# Altium PCB 300yuan.PcbDoc
Units mil, origin at the board's own origin, x right, y up, seen from the top; angles counter-clockwise.
Board outline 3134.96 x 3151.95 mil, 2 copper layers (Top Layer, Bottom Layer); 35 components, 23 nets, 152 pads, 18 vias.
Unrouted connection lines stored in the file: 4.
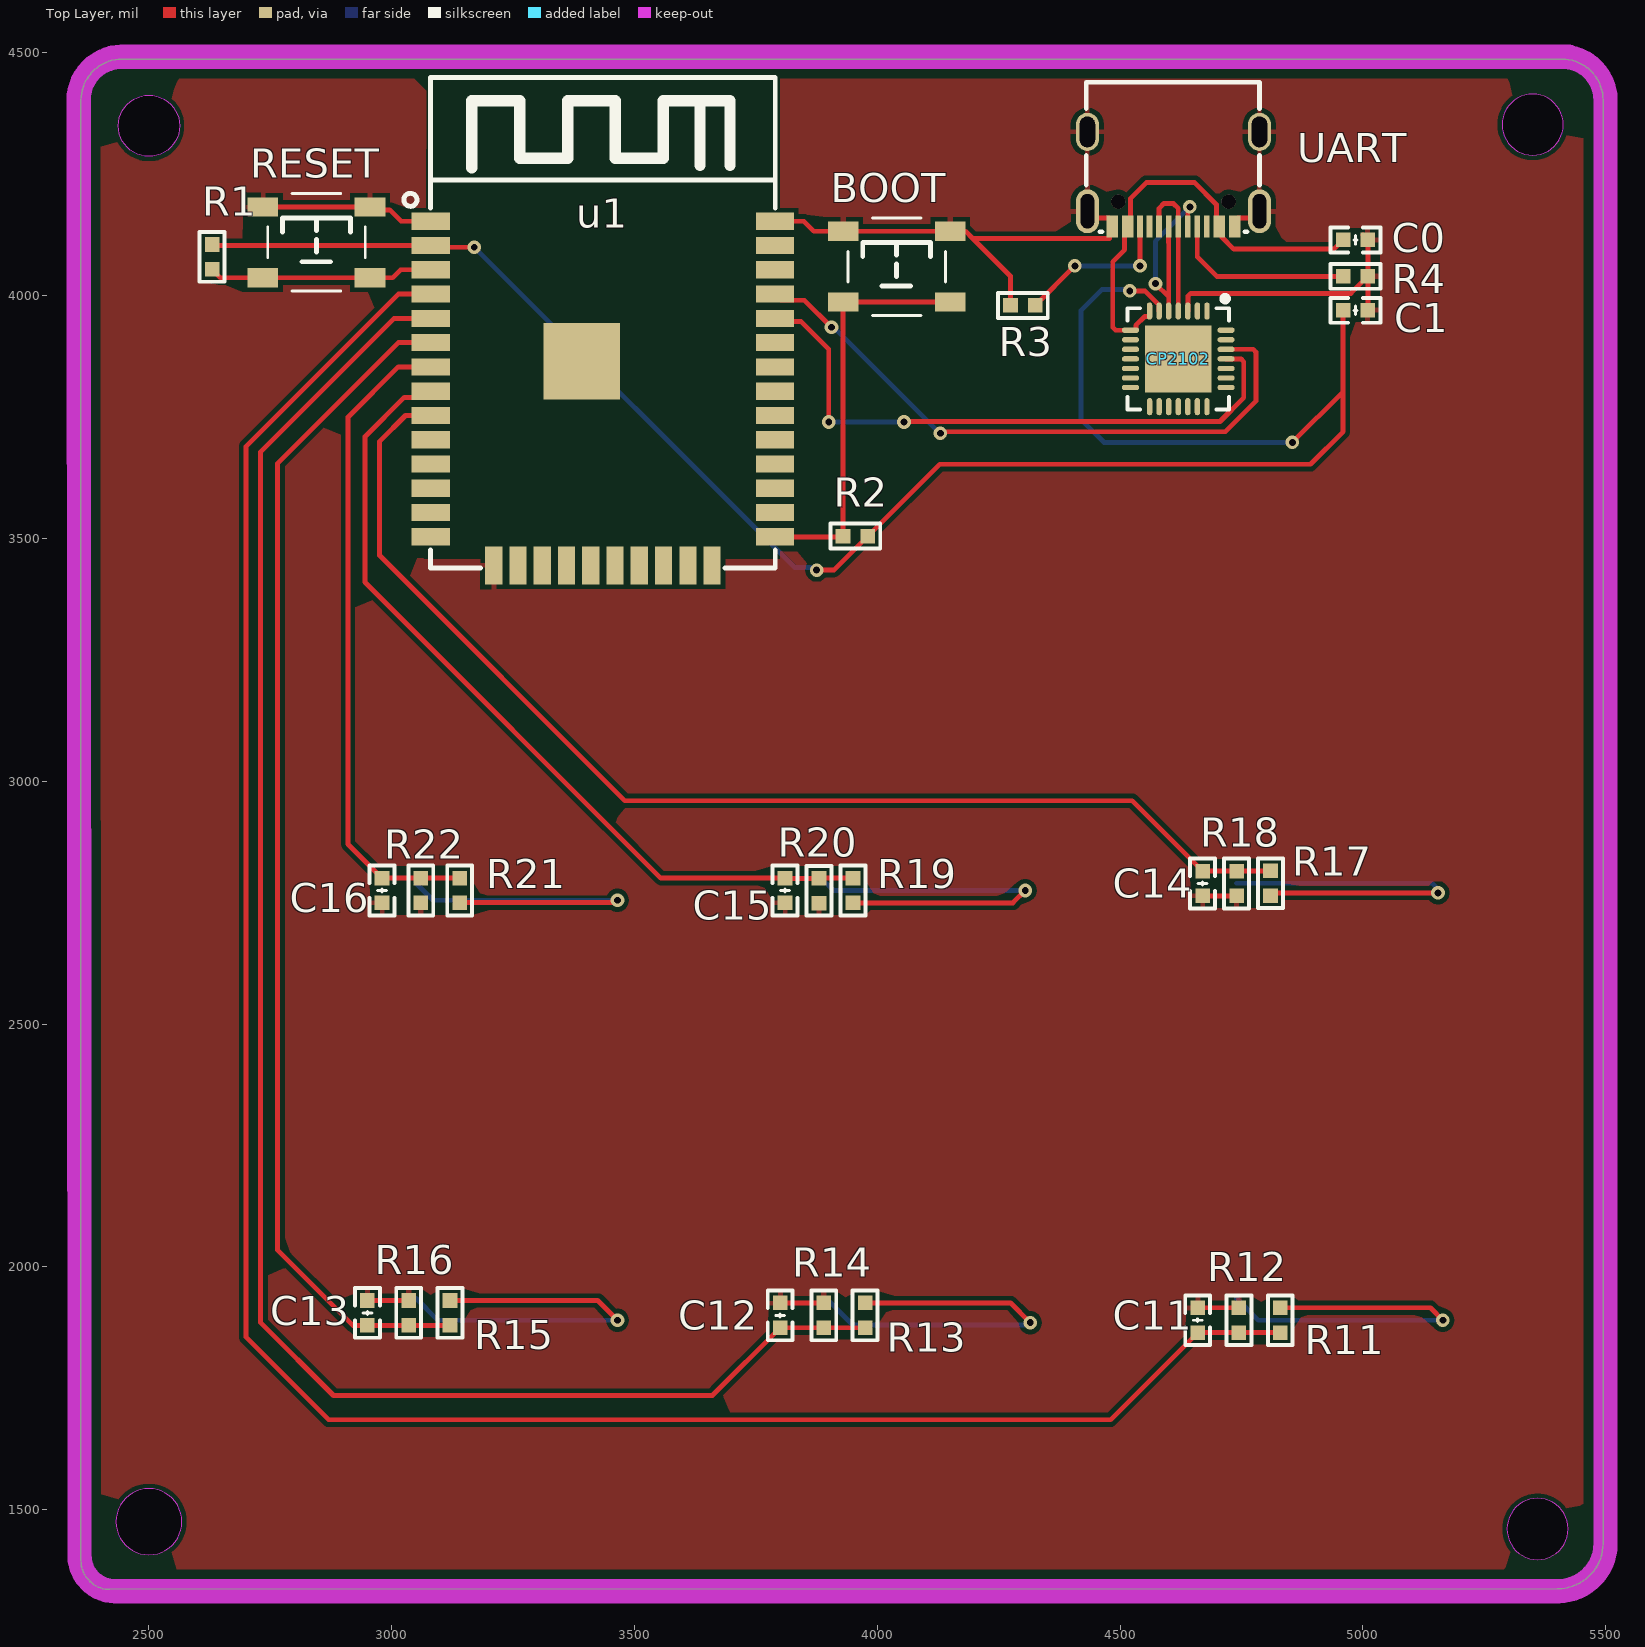
[diagram p0: Top Layer view]
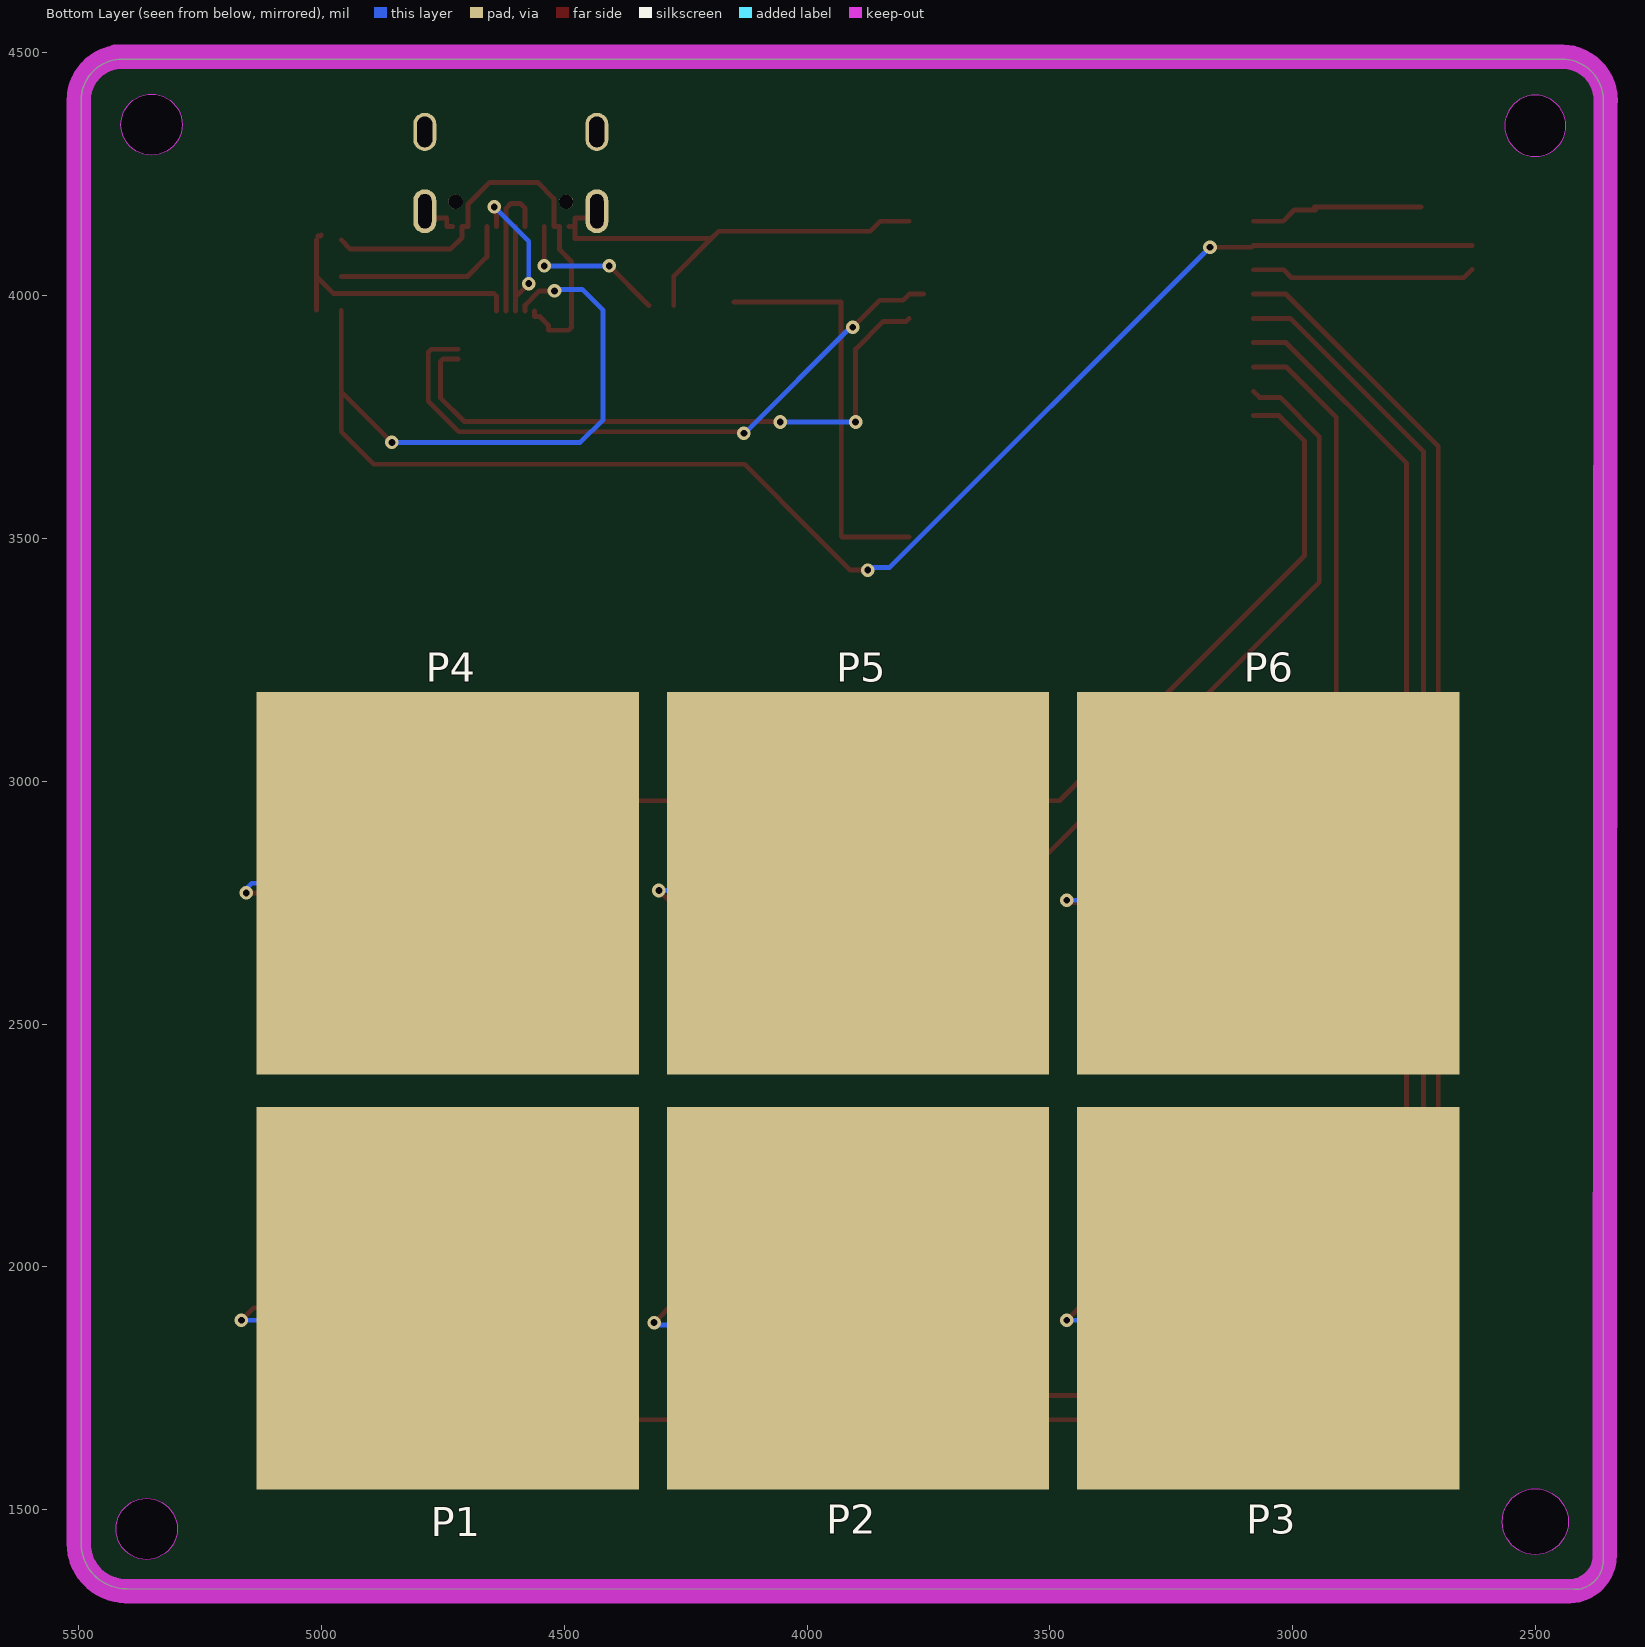
[diagram p1: Bottom Layer view, seen from below]
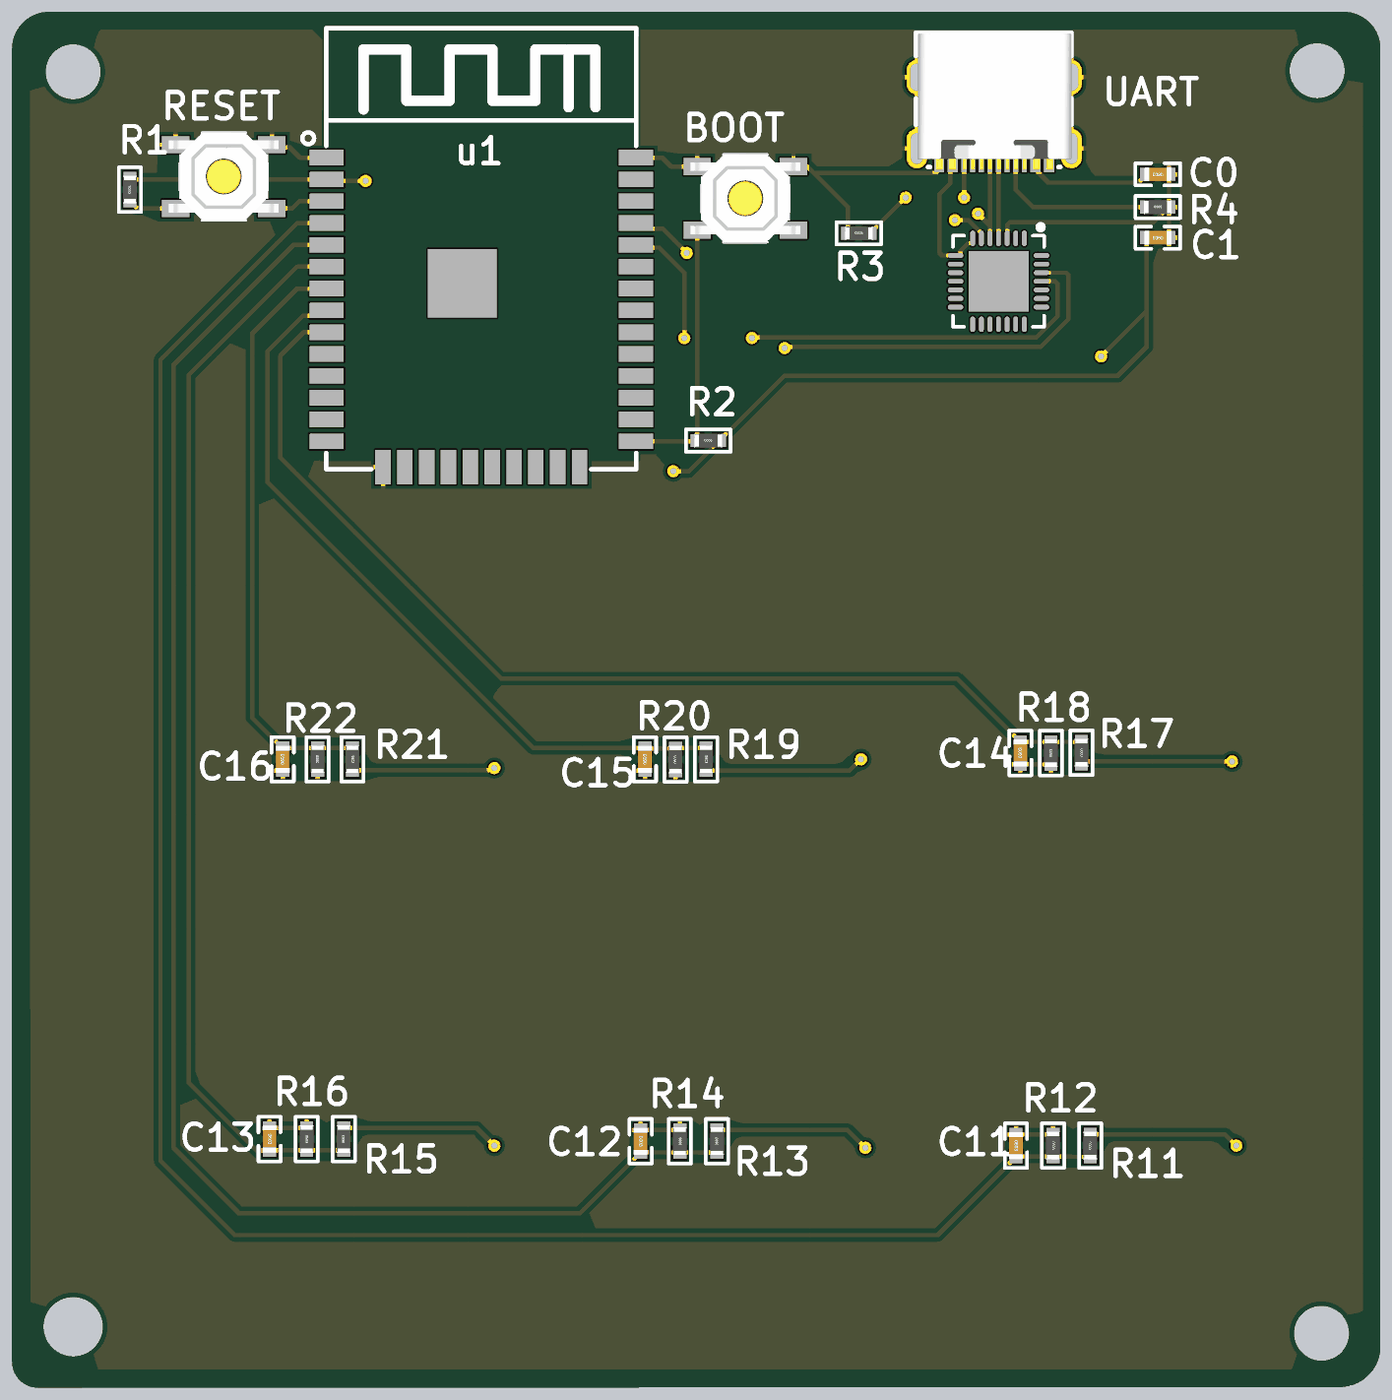
[diagram p2: 3D render of the assembled board from above, using the file's embedded part models]

## Layer stack, top to bottom
Top Solder: solder mask 0.4, Solder Resist, Dk 3.5
Top Layer: signal copper 1.4
Dielectric 1: dielectric 12.6, FR-4, Dk 4.8
Bottom Layer: signal copper 1.4
Bottom Solder: solder mask 0.4, Solder Resist, Dk 3.5

## Board outline
2360,1395 ccw(c2419.59,1395) 2419.59,1335.41 5401.69,1336.73 5401.94,1336.98 ccw(c5401.94,1430) 5494.96,1430 5494.96,4402.72 ccw(c5410.31,4402.72) 5410.31,4487.36 2444.72,4487.36 2444.64,4487.29 ccw(c2444.64,4402.65) 2360,4402.65
cut-out: 2500,4287.01 cw(c2500,4350) 2437.01,4350 cw(c2500,4350) 2500,4412.99 cw(c2500,4350) 2562.99,4350 cw(c2500,4350)
cut-out: 2431.99,1475 ccw(c2500,1475) 2500,1406.99 ccw(c2500,1475) 2568.01,1475 ccw(c2500,1475) 2500,1543.01 ccw(c2500,1475)
cut-out: 5287.01,4352.38 ccw(c5350,4352.38) 5350,4289.38 ccw(c5350,4352.38) 5413,4352.38 ccw(c5350,4352.38) 5350,4415.37 ccw(c5350,4352.38)
cut-out: 5297.01,1460 ccw(c5360,1460) 5360,1397.01 ccw(c5360,1460) 5422.99,1460 ccw(c5360,1460) 5360,1522.99 ccw(c5360,1460)

## Design rules (kind name [scope] priority, off if disabled: settings)
Clearance Clearance_1 [InPolygon vs OnLayer('Keep-Out Layer')] p1: gap=20 ignorepadtopadclearanceinfootprint=FALSE
Clearance [All] p2: gap=10 ignorepadtopadclearanceinfootprint=FALSE except(0: Arc-Hole Track-Hole SMDPad-Hole THPad-Hole Via-Hole Fill-Hole Poly-Hole Region-Hole Text-Hole; 1: Arc-SMDPad Track-SMDPad SMDPad-SMDPad; 5: Arc-Arc Arc-Track Arc-THPad Arc-Via Track-Track Track-THPad Track-Via SMDPad-THPad SMDPad-Via THPad-THPad THPad-Via Via-Via)
MinimumSolderMaskSliver [All] p1: minsoldermaskwidth=0
PolygonConnect [All] p1: connectstyle=Relief reliefconductorwidth=10 reliefentries=4 polygonreliefangle="90 Angle" airgapwidth=10
RoutingVias [All] p1: holewidth=14 width=28 viastyle="Through Hole" minholewidth=14 minwidth=28 maxholewidth=14 maxwidth=28
SilkToSolderMaskClearance [IsPad] p1: minsilkscreentomaskgap=0 clearancetoexposedcopper=TRUE
SolderMaskExpansion [All] p1: expansion=4 istentingtop=FALSE
Width [All] p1: maxlimit=10 minlimit=10 preferedwidth=10
28 further rules are at their usual default settings.

## Components (designator, comment, footprint, x,y, rotation, side; value= is the part's Value field where it differs from the comment)
BOOT "4x4x1.5" "SW SMD-4*4*1.5" 4040,4060 r0 top
C0 "1uF" C0603_L 4985,4115 r180 top
C1 "1uF" C0603_L 4985,3970 r180 top
C11 "0.1uF" C0603_L 4660,1890 r270 top
C12 "0.1uF" C0603_L 3800,1900 r270 top
C13 "0.1uF" C0603_L 2950,1905 r270 top
C14 "0.1uF" C0603_L 4670,2789.41 r90 top
C15 "0.1uF" C0603_L 3810,2775 r90 top
C16 "0.1uF" C0603_L 2980,2775 r90 top
CP2102 "" PCBComponent_1 4620,3870 r180 top
P1 "2*2" 2*2 4740,1930 r180 bottom (schematic designator p1)
P2 "2*2" 2*2 3895,1930 r180 bottom (schematic designator p2)
P3 "2*2" 2*2 3050,1930 r180 bottom (schematic designator p3)
P4 "2*2" 2*2 4740,2785 r180 bottom (schematic designator p4)
P5 "2*2" 2*2 3895,2785 r180 bottom (schematic designator p5)
P6 "2*2" 2*2 3050,2785 r180 bottom (schematic designator p6)
R1 "12K" R0603_L 2630,4080 r90 top
R2 "12K" R0603_L 3955,3505 r0 top
R3 "5.1K" R0603_L 4300,3980 r0 top
R4 "5.1K" R0603_L 4985,4040 r0 top
R11 "1K" R0603_L 4830,1890 r90 top
R12 "1K" R0603_L 4745,1890 r270 top
R13 "1K" R0603_L 3975,1900 r90 top
R14 "1K" R0603_L 3890,1900 r270 top
R15 "1K" R0603_L 3120,1905 r90 top
R16 "1K" R0603_L 3035,1905 r270 top
R17 "1K" R0603_L 4810,2790 r270 top
R18 "1K" R0603_L 4740,2789.41 r90 top
R19 "1K" R0603_L 3950,2775 r270 top
R20 "1K" R0603_L 3880,2774.41 r90 top
R21 "1K" R0603_L 3140,2775 r270 top
R22 "1K" R0603_L 3060,2775 r90 top
RESET "4x4x1.5" "SW SMD-4*4*1.5" 2845,4110 r0 top
u1 "esp32" esp32 3400,4005 r0 top
UART "TYPE-C 2.0 -16P" USB-C-SMD_16P 4610,4240 r0 top (schematic designator USBC?)

## Footprints (in the part's own frame and the unit in brackets; to place one, negate y for a bottom-side part, rotate by r counter-clockwise, add the part's x,y. Pads: shape width x height; smd on the part's side, far side on the other; paste and mask are expansions set on the pad)
2*2 [mm]
  rect 20x20 smd: 1(0,0.127)
C0603_L [mil] "无极性贴片电容"
  rect 30x30 smd: 1(-25.59,0) 2(25.59,0)
  silkscreen extent -51,-26 51,26, body extent -31,-16 32,16, height 33
esp32 [mm]
  rect 2x0.9 smd: 1(-8.113,3.77) 2(-8.113,2.5) 3(-8.113,1.23) 4(-8.113,-0.04) 5(-8.113,-1.31) 6(-8.113,-2.58) 7(-8.113,-3.85) 8(-8.113,-5.12) 9(-8.113,-6.39) 10(-8.113,-7.66) 11(-8.113,-8.93) 12(-8.113,-10.2) 13(-8.113,-11.47) 14(-8.113,-12.74) 25(9.887,-12.74) 26(9.887,-11.47) 27(9.887,-10.2) 28(9.887,-8.93) 29(9.887,-7.66) 30(9.887,-6.39) 31(9.887,-5.12) 32(9.887,-3.85) 33(9.887,-2.58) 34(9.887,-1.31) 35(9.887,-0.04) 36(9.887,1.23) 37(9.887,2.5) 38(9.887,3.77)
  rect 0.9x2 smd: 15(-4.828,-14.24) 16(-3.558,-14.24) 17(-2.288,-14.24) 18(-1.018,-14.24) 19(0.252,-14.24) 20(1.522,-14.24) 21(2.792,-14.24) 22(4.062,-14.24) 23(5.332,-14.24) 24(6.602,-14.24)
  rect 4x4 smd: 39(-0.213,-3.546)
  silkscreen extent -9.52,-14.37 9.91,11.3
PCBComponent_1 [mm]
  oval 0.28x0.9 smd: 1(-1.501,-2.5) 2(-1.001,-2.5) 3(-0.5,-2.5) 4(0,-2.5) 5(0.5,-2.5) 6(1.001,-2.5) 7(1.501,-2.5) 15(1.501,2.5) 16(1.001,2.5) 17(0.5,2.5) 18(0,2.5) 19(-0.5,2.5) 20(-1.001,2.5) 21(-1.501,2.5)
  oval 0.9x0.28 smd: 8(2.5,-1.501) 9(2.5,-1.001) 10(2.5,-0.5) 11(2.5,0) 12(2.5,0.5) 13(2.5,1.001) 14(2.5,1.501) 22(-2.5,1.501) 23(-2.5,1.001) 24(-2.5,0.5) 25(-2.5,0) 26(-2.5,-0.5) 27(-2.5,-1.001) 28(-2.5,-1.501)
  rect 3.5x3.5 smd: 29(0,0)
  silkscreen extent -2.65,-3.3 2.65,2.65
R0603_L [mil] "1/10W贴片电阻"
  rect 30x30 smd: 1(-25.59,0) 2(25.59,0)
  silkscreen extent -51,-26 51,26, body extent -31,-16 32,16, height 16
"SW SMD-4*4*1.5" [mm] "轻触开关，长宽高：4*4*1.5mm           淘宝ID:黄晶宝石"
  rect 1.6x1 smd: 1(-2.8,1.85) 2(-2.8,-1.85) 3(2.8,-1.85) 4(2.8,1.85)
  silkscreen extent -2.55,-2.55 2.55,2.55, body extent -3.2,-2.6 3.2,2.6, height 1.5
USB-C-SMD_16P [mm] "封装库来自淘宝ID:黄晶宝石"
  oval 1.2x2.3 hole 0.7 slot 1.8 at 90 deg: 0(-4.5,-1.675) 0(4.5,-1.675)
  oval 1.2x2 hole 0.8 slot 1.6 at 90 deg: 0(-4.5,2.475) 0(4.5,2.475)
  rect 0.3x1.15 smd: A1(3.35,-2.473) A4(2.55,-2.471) A5(1.25,-2.475) A6(0.25,-2.475) A7(-0.25,-2.473) A9(-2.55,-2.475) A12(-3.35,-2.475) B1(-3.05,-2.475) B4(-2.25,-2.475) B5(-1.75,-2.475) B6(-0.75,-2.475) B7(0.75,-2.473) B9(2.25,-2.471) B12(3.05,-2.473)
  rect 0.3x1.148 smd: A8(1.75,-2.475) B8(-1.25,-2.475)
  round 0.75 hole 0.75 unplated: ""(-2.89,-1.175) ""(2.89,-1.175)
  silkscreen extent -4.56,-2.75 4.5,5.08, body extent -4.44,-2.87 4.5,5.03, height 3.25

## Part data
BOOT RESET: library part "SW SMD-4x4", "贴片4x4轻触开关", BOM名称=贴片4x4轻触开关, 封装库来自淘宝卖家ID：黄晶宝石=其他店铺购入均为盗版假冒封装库，请立即申请退款, 联系卖家，免费查找封装=唯一出售店铺网址https://shop463601444.taobao.com
C0 C1 C11 C12 C13 C14 C15 C16: library part C, "贴片电容", BOM名称=无极性贴片电容, 封装库来自淘宝卖家ID： 黄晶宝石=其他店铺购入均为盗版假冒封装库，请立即申请退款，本店现金奖励5-50元, 联系卖家，免费查找封装=唯一出售店铺网址https://shop463601444.taobao.com
CP2102: library part cp2102
R1 R2 R3 R4 R11 R12 R13 R14 R15 R16 R17 R18 R19 R20 R21 R22: library part R, "贴片电阻", BOM名称=贴片电阻, 封装库来自淘宝卖家ID： 黄晶宝石=其他店铺购入均为盗版假冒封装库，请立即申请退款，本店现金奖励5-50元, 联系卖家，免费查找封装=唯一出售店铺网址https://shop463601444.taobao.com
UART: library part USB2.0_Type-C_16Pin, "USB2.0_Type-C_16Pin母座", 联系卖家 免费技术支持=封装库来自淘宝卖家ID：黄晶宝石, 联系卖家 免费查找封装=唯一出售店铺网址https://shop463601444.taobao.com

## Via types
v1: diameter 28, hole 14, Top Layer to Bottom Layer, 18 vias

## Nets (pads, with @x,y where several pads share a name; then routed paths per layer and width w, separated by ;. In a path a pad name is that pad's centre, name@x,y a point inside that pad or via, vN(x,y) a via of type N, cw(c..) or ccw(c..) an arc to the next point about the centre after c; other vN are vias at no path point)
3V3: C1.2 CP2102.6 R1.2 R2.2 u1.2 | length 4005.5
  Top Layer w10: R1.2@2630,4103.43 u1.2 3084.03,4100 v1(3170,4100) ; v1(3875,3435) 3910.59,3435 R2.2 4128.59,3653 4892.41,3653 4959.41,3720 4959.41,3802.41 ; v1(4520,4010) 4551.22,4010 4580.6,3980.62 CP2102.6 ; v1(4855,3698) 4959.41,3802.41 ; C1.2 4959.41,3802.41
  Bottom Layer w10: v1(3170,4100) 3829.57,3440.43 3864.7,3440.43 3870.13,3435 v1(3875,3435) ; v1(4520,4010) 4517,4013 4463,4013 4420,3970 4420,3745 4467,3698 v1(4855,3698)
5V: C0.2 CP2102.7 CP2102.8 UART.A4 UART.A9 UART.B4 UART.B9 | length 947
  Top Layer w10: CP2102.7@4560.7,3968.22 CP2102.7 ; CP2102.7@4561.37,3965 4561.37,3958.2 4560.43,3957.25 4550.85,3957.25 4532.74,3939.14 4532.74,3929.57 4532.27,3929.1 4490.86,3929.1 4485,3934.96 4485,4070 4509.61,4094.61 UART.A9 UART.B4 4521.42,4200 4554.78,4233.36 4653.22,4233.36 4698.58,4188 UART.B9 UART.A4 4710.39,4120 4734.39,4096 4940.41,4096 C0.2
AD0: C11.2 R11.1 R12.2 u1.4 | length 4620.2
  Top Layer w10: u1.4 3013.43,4003.43 2700,3690 2700,1855 2870,1685 4480.58,1685 C11.2 R12.2 4787,1864.41 R11.1
AD3: C12.2 R13.1 R14.2 u1.5 | length 3622.9
  Top Layer w10: u1.5 3004.83,3953.43 2730,3678.6 2730,1885 2880,1735 3660.58,1735 C12.2 R14.2 3932,1874.41 R13.1
AD4: C13.2 R15.1 R16.2 u1.6 | length 2458.4
  Top Layer w10: u1.6 3013.43,3903.43 2765,3655 2765,2034.28 2919.87,1879.41 C13.2 R16.2 3077,1879.41 R15.1
AD5: C14.2 R17.1 R18.2 u1.9 | length 2467.2
  Top Layer w10: u1.9 3028.43,3753.43 2975,3700 2975,3465 3480,2960 4525,2960 C14.2 R18.2 4809.4,2815 R17.1
AD6: C15.2 R19.1 R20.2 u1.8 | length 1731.4
  Top Layer w10: u1.8 3067.88,3790.71 3025.71,3790.71 2945,3710 2945,3410 3554.41,2800.59 C15.2 ; C15.2@3810.59,2800 R20.2 3880.59,2800.59 R19.1
AD7: C16.2 R21.1 R22.2 u1.7 | length 1351.8
  Top Layer w10: u1.7 3013.43,3853.43 2910,3750 2910,2870.59 C16.2 R22.2 R21.1
D+: CP2102.4 UART.A6 UART.B6 | length 296.8
  Top Layer w10: UART.B6 4580.47,4180 4590.47,4190 4609.84,4190 4619.84,4180 UART.A6 4619.84,4140.9 4620,4140.9 CP2102.4
D-: CP2102.5 UART.A7 UART.B7 | length 442.5
  Top Layer w10: v1(4573,4025) 4600.3,3997.7 ; UART.A7 4600.16,4109.87 4600.3,4109.72 4600.3,3997.7 ; CP2102.5 4600.3,3997.7 ; UART.B7 4639.53,4178.53 v1(4644,4183)
  Bottom Layer w10: v1(4573,4025) 4573,4112 v1(4644,4183)
GND: BOOT.1 BOOT.4 C0.1 C1.1 C11.1 C12.1 C13.1 C14.1 C15.1 C16.1 CP2102.3 R3.1 R4.2 R12.1 R14.1 R16.1 R18.1 R20.1 R22.1 RESET.1 RESET.4 u1.1 u1.15 u1.38 UART.0 UART.A1 UART.A12 UART.B1 UART.B12 | length 2317.2
  Top Layer w10: RESET.1 RESET.4 ; C13.1 R16.1 ; RESET.4@2952.23,4176.96 2995.87,4176.96 3019.4,4153.43 u1.1 ; u1.38 3849,4153.43 3869.6,4132.83 BOOT.1 BOOT.4 4182.17,4132.83 4197,4118 ; C12.1 R14.1 ; R3.1 4274.41,4040.59 4197,4118 ; UART.0@4432.83,4174.06 4446.69,4160.2 4477.21,4160.2 4478.11,4159.3 UART.A12 ; UART.B1 UART.A12 ; CP2102.3 4639.7,3999.14 4645.56,4005 4975.59,4005 R4.2 ; C11.1 R12.1 ; C14.1 R18.1 ; UART.B12 UART.A1 4741.89,4159.36 4742.8,4160.26 4773.37,4160.26 UART.0@4787.17,4174.06 ; C0.1@5000.59,4125 5002.5,4123.09 C0.1@5006.91,4123.09 ; C1.1 5010.59,4004 R4.2 ; C0.1 5010.59,4077.01 R4.2 ; 4197,4118 4478.11,4118 UART.A12
NetBOOT_2: BOOT.2 BOOT.3 R2.1 u1.25 | length 843.6
  Top Layer w10: u1.25 3927.84,3503.43 R2.1 3929.41,3745 3929.76,3745.36 BOOT.2 BOOT.3
Netp1_1: P1.1 R11.2 | length 789.2
  Top Layer w10: R11.2 5139.41,1915.59 v1(5165,1890)
  Bottom Layer w10: P1.1 4785,1890 v1(5165,1890)
Netp2_1: P2.1 R13.2 | length 801.7
  Top Layer w10: R13.2 4274.41,1925.59 v1(4315,1885)
  Bottom Layer w10: P2.1 3950,1880 4305.13,1880 4310.13,1885 v1(4315,1885)
Netp3_1: P3.1 R15.2 | length 795.4
  Top Layer w10: R15.2 3424.41,1930.59 v1(3465,1890)
  Bottom Layer w10: P3.1 3095,1890 v1(3465,1890)
Netp4_1: P4.1 R17.2 | length 775.4
  Top Layer w10: R17.2 4815.58,2770 v1(5155,2770)
  Bottom Layer w10: P4.1 5143.24,2790 5151.56,2781.69 5151.56,2773.44 v1(5155,2770)
Netp5_1: P5.1 R19.2 | length 781.8
  Top Layer w10: R19.2 4279.41,2749.41 v1(4305,2775)
  Bottom Layer w10: P5.1 3910,2775 v1(4305,2775)
Netp6_1: P6.1 R21.2 | length 756.8
  Top Layer w10: R21.2 3140.58,2750 3455.13,2750 3460.13,2755 v1(3465,2755)
  Bottom Layer w10: P6.1 3085,2755 v1(3465,2755)
NetR1_1: R1.1 RESET.2 RESET.3 u1.3 | length 464.5
  Top Layer w10: R1.1 2647.24,4037.17 RESET.2 RESET.3 3002.17,4037.17 3018.43,4053.43 u1.3
NetR3_2: R3.2 UART.B5 | length 330.3
  Top Layer w10: R3.2 v1(4407.18,4061.59) ; v1(4541.1,4061.59) UART.B5
  Bottom Layer w10: v1(4407.18,4061.59) v1(4541.1,4061.59)
NetR4_1: R4.1 UART.A5 | length 379.3
  Top Layer w10: UART.A5 4659.21,4080 4699.22,4040 R4.1
RXD: CP2102.25 u1.34 | length 1275.9
  Top Layer w10: u1.34 3795.47,3947.22 3842.78,3947.22 3900,3890 v1(3900,3740) ; v1(4055,3740) 4056,3741 4706,3741 4755,3790 4755,3864.14 4749.14,3870 CP2102.25
  Bottom Layer w10: v1(3900,3740) v1(4055,3740)
TXD: CP2102.26 u1.35 | length 1330.8
  Top Layer w10: u1.35@3760,4003.43 u1.35 3801.98,3990.71 3850.05,3990.71 v1(3905.76,3935) ; v1(4130,3717) 4133,3720 4717,3720 4780,3783 4780,3883.84 4774.14,3889.7 CP2102.26
  Bottom Layer w10: v1(3905.76,3935) 3910.38,3935 4128.38,3717 v1(4130,3717)
pads on no net: CP2102.1 CP2102.2 CP2102.9 CP2102.10 CP2102.11 CP2102.12 CP2102.13 CP2102.14 CP2102.15 CP2102.16 CP2102.17 CP2102.18 CP2102.19 CP2102.20 CP2102.21 CP2102.22 CP2102.23 CP2102.24 CP2102.27 CP2102.28 CP2102.29 u1.10 u1.11 u1.12 u1.13 u1.14 u1.16 u1.17 u1.18 u1.19 u1.20 u1.21 u1.22 u1.23 u1.24 u1.26 u1.27 u1.28 u1.29 u1.30 u1.31 u1.32 u1.33 u1.36 u1.37 u1.39 UART. UART.A8 UART.B8

## Polygon pours and split planes (outlines as drawn)
GND on Top Layer "GND_L01_P003" (solid, remove dead copper, pour order 3): 2356.71,1406.07 ccw(c2431.07,1406.07) 2431.07,1331.71 ccw(c2431.07,1336.73) 2431.07,1331.71 5401.94,1331.96 ccw(c5401.94,1430) 5499.98,1430 5499.98,4402.72 ccw(c5410.31,4402.72) 5426.26,4490.95 ccw(c5422.83,4487.29) 5422.83,4492.31 5413.95,4492.31 ccw(c5410.31,4402.72) 5410.31,4492.38 ccw(c5410.31,4487.36) 5409.46,4492.31 2444.64,4492.31 ccw(c2444.64,4487.29) 2444.54,4492.3 cw(c2444.64,4402.65) 2444.64,4492.3 2444.54,4492.3 ccw(c2444.64,4402.65) 2354.99,4402.65 ccw(c2360,4402.65) 2355.34,4400.8

## Keep-outs
Keep-Out Layer:
  lines w50: 2354.99,4402.65 ccw(c2360,4402.65) 2355.34,4400.8 ; 2354.98,4402.65 cw(c2444.64,4402.65) 2444.54,4492.3 ; 2354.99,4402.65 ccw(c2360,4402.65) 2355.34,4400.8 ; 2354.98,4402.65 cw(c2444.64,4402.65) 2444.54,4492.3 ; 2355.34,4400.8 2356.71,1406.07 ; 2355.34,4400.8 2356.71,1406.07 ; 2356.71,1406.07 ccw(c2431.07,1406.07) 2431.07,1331.71 ; 2356.71,1406.07 ccw(c2431.07,1406.07) 2431.07,1331.71 ; 2431.07,1331.71 ccw(c2431.07,1336.73) 2431.07,1331.71 ; 2431.07,1331.71 ccw(c2431.07,1336.73) 2431.07,1331.71 ; 2431.07,1331.71 5401.94,1331.96 ; 2431.07,1331.71 5401.94,1331.96 ; 2444.54,4492.3 cw(c2444.64,4402.65) 2444.64,4492.3 ; 2444.54,4492.3 cw(c2444.64,4487.29) 2444.64,4492.31 ; 2444.54,4492.3 cw(c2444.64,4402.65) 2444.64,4492.3 ; 2444.54,4492.3 cw(c2444.64,4487.29) 2444.64,4492.31 ; 2444.54,4492.3 2444.64,4492.3 ; 2444.54,4492.3 2444.64,4492.3 ; 2444.64,4492.31 5409.46,4492.31 ; 2444.64,4492.31 5409.46,4492.31 ; 5401.94,1331.96 ccw(c5401.94,1430) 5499.97,1430 cw(c5401.94,1430) 5401.94,1331.96 ; 5409.46,4492.31 cw(c5410.31,4487.36) 5410.31,4492.38 ; 5409.46,4492.31 cw(c5410.31,4487.36) 5410.31,4492.38 ; 5410.31,4492.38 cw(c5410.31,4402.72) 5413.95,4492.31 ; 5410.31,4492.38 cw(c5410.31,4402.72) 5413.95,4492.31 ; 5413.95,4492.31 5422.83,4492.31 ; 5413.95,4492.31 5422.83,4492.31 ; 5422.83,4492.31 cw(c5422.83,4487.29) 5426.26,4490.95 ; 5422.83,4492.31 cw(c5422.83,4487.29) 5426.26,4490.95 ; 5426.26,4490.95 cw(c5410.31,4402.72) 5499.98,4402.72 ; 5426.26,4490.95 cw(c5410.31,4402.72) 5499.98,4402.72 ; 5499.98,4402.72 5499.98,1430 5499.98,4402.72

## Other copper
Multi-Layer:
  pour cut-out: 3071.48,4472.5 3800,4472.5 3800,3457.5 3066.51,3457.5
  pour cut-out: 4535,4115 4550,4100 4540,4090 4540,3675 4125,3675 3880,3430 3825,3485 3825,4090 3800,4115

## Silkscreen, mask and mechanical layers (free items; w line width, h text height)
Mechanical 1:
  circle w10: c2500,1475 r62.99
  circle w10: c5350,4350 r62.99
  circle w10: c5360,1460 r62.99
  circle w10: c2500,4350 r62.99
  lines w10: 2444.64,4487.29 ccw(c2444.64,4402.65) 2360,4402.65 2360,1395 ccw(c2419.59,1395) 2419.59,1335.41 5401.69,1336.73 ; 2444.72,4487.36 5410.31,4487.36 cw(c5410.31,4402.72) 5494.96,4402.72 5494.96,1430 cw(c5401.94,1430) 5401.94,1336.98